# Allegro board PCB_ESP32-P4-EYE-MB_V2.3_20250411.brd
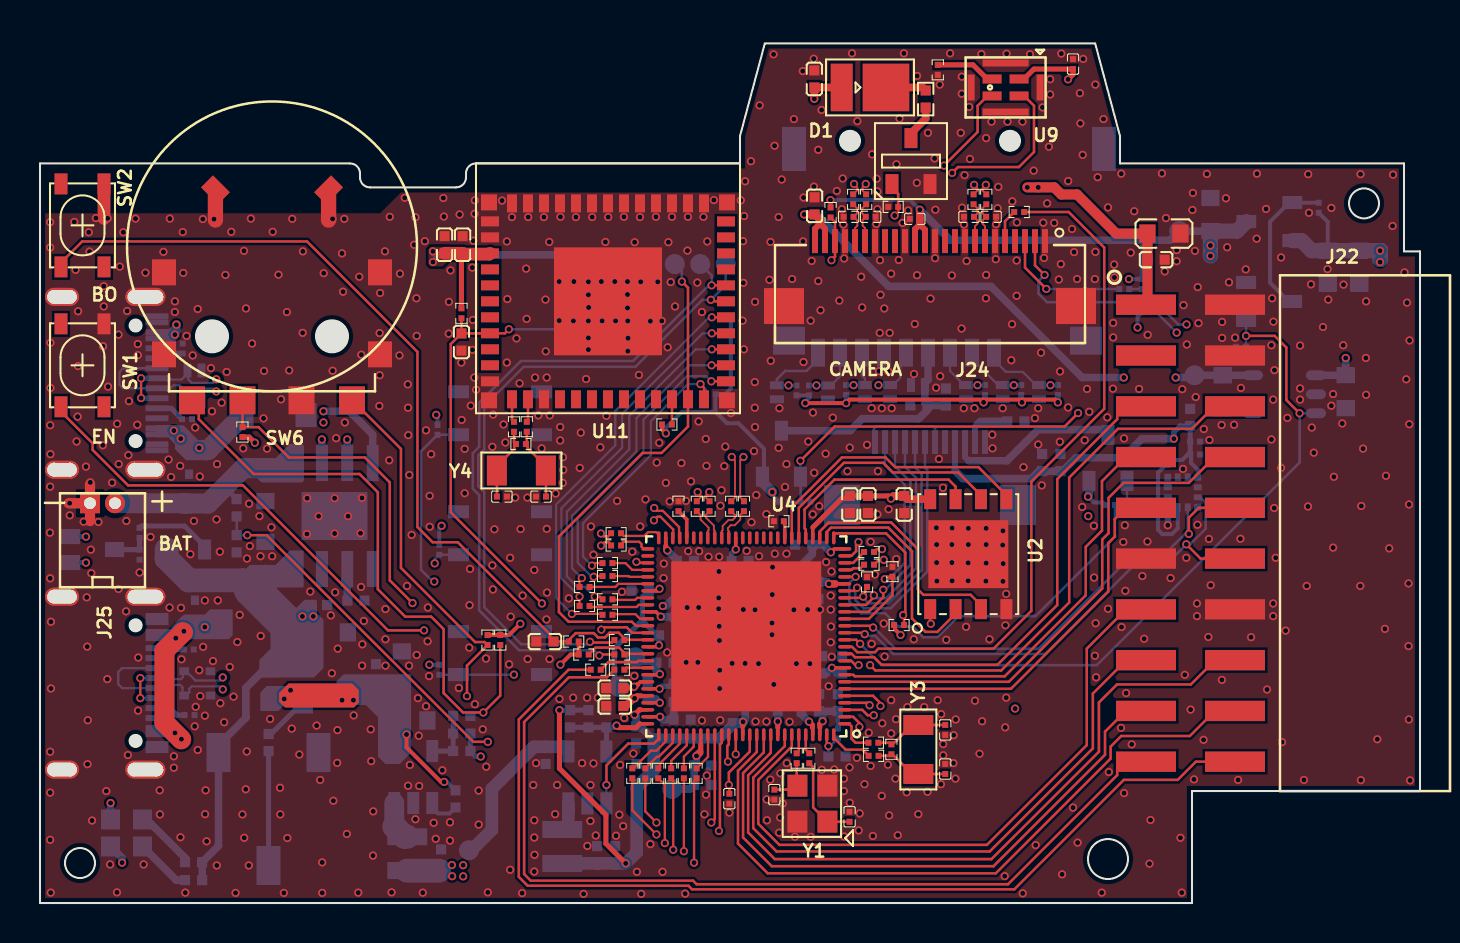
[diagram p0: board, top side]
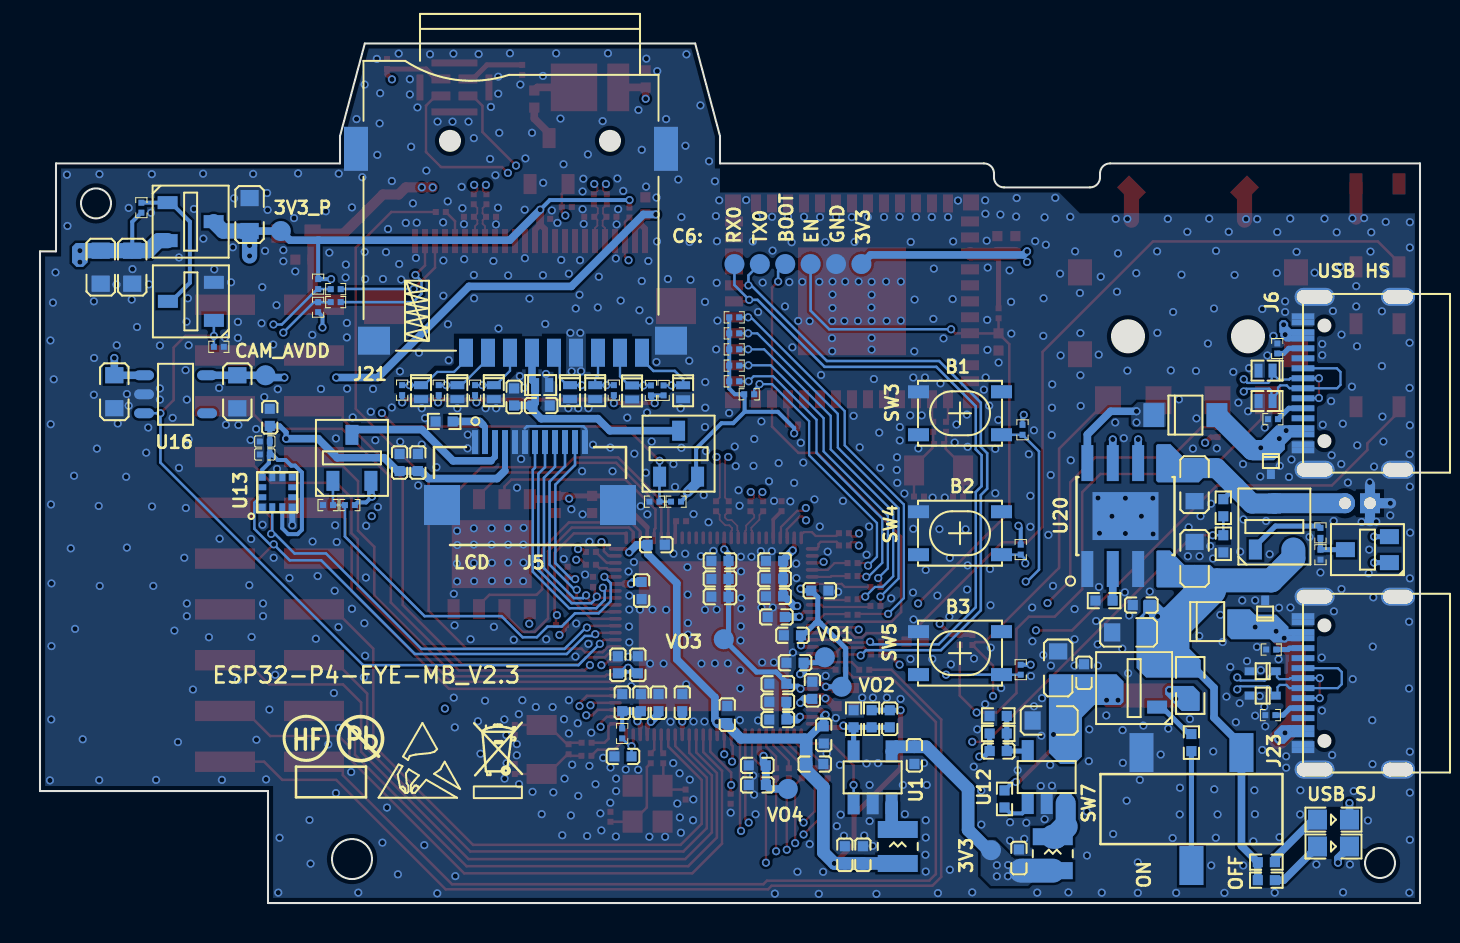
[diagram p1: board, bottom side, seen from below]

Outline 69 x 43 mm; copper layers: TOP, L2_GND1, L3_SIGNAL, L4_GND2, L5_POWER, BOTTOM. Coordinates in mm from the lower left corner of the outline.
Outline path: circle c2,2 r0.75 ; circle c2.5,20 r0.25 ; circle c3.75,20 r0.25 ; circle c4.78,28.89 r0.3 ; circle c4.78,23.11 r0.3 ; circle c4.78,13.89 r0.3 ; circle c4.78,8.11 r0.3 ; circle c8.6,28.35 r0.8 ; circle c14.6,28.35 r0.8 ; circle c40.5,38.13 r0.5 ; circle c48.5,38.13 r0.5 ; circle c53.4,2.2 r1 ; circle c66.2,35 r0.75 ; 0,37 0,0 57.6,0 57.6,5.6 69,5.6 69,32.6 68.2,32.6 68.2,37 54,37 54,38.37 52.76,43 36.24,43 35,38.37 35,37 21.8,37 arc(21.45,36.85) 21.3,36.5 21.3,36.3 arc(21.15,35.95) 20.8,35.8 16.5,35.8 arc(16.15,35.95) 16,36.3 16,36.5 arc(15.85,36.85) 15.5,37 0,37 ; 0.7,30.02 arc(0.4,30.32) 0.7,30.62 1.5,30.62 arc(1.8,30.32) 1.5,30.02 0.7,30.02 ; 0.7,21.38 arc(0.4,21.68) 0.7,21.98 1.5,21.98 arc(1.8,21.68) 1.5,21.38 0.7,21.38 ; 0.7,15.03 arc(0.4,15.32) 0.7,15.62 1.5,15.62 arc(1.8,15.32) 1.5,15.03 0.7,15.03 ; 0.7,6.38 arc(0.4,6.67) 0.7,6.97 1.5,6.97 arc(1.8,6.67) 1.5,6.38 0.7,6.38 ; 4.72,30.02 arc(4.42,30.32) 4.72,30.62 5.82,30.62 arc(6.12,30.32) 5.82,30.02 4.72,30.02 ; 4.72,21.38 arc(4.42,21.68) 4.72,21.98 5.82,21.98 arc(6.12,21.68) 5.82,21.38 4.72,21.38 ; 4.72,15.03 arc(4.42,15.32) 4.72,15.62 5.82,15.62 arc(6.12,15.32) 5.82,15.03 4.72,15.03 ; 4.72,6.38 arc(4.42,6.67) 4.72,6.97 5.82,6.97 arc(6.12,6.67) 5.82,6.38 4.72,6.38

## Design rules (mm)
net group CAM_C: nets CAM_CN CAM_CP
net group CAM_D: nets CAM_DN CAM_DP
net group CSI_CLKN: nets CSI_CLKN CSI_CLKN_A
net group CSI_CLKP: nets CSI_CLKP CSI_CLKP_A
net group CSI_DATA0N: nets CSI_DATA0N CSI_DATA0N_A
net group CSI_DATA0P: nets CSI_DATA0P CSI_DATA0P_A
net group GPIO24: nets GPIO24 USB_SJ_DN
net group GPIO25: nets GPIO25 USB_SJ_DP
net group GPIO27: nets GPIO27 SD2_CMD
net group GPIO28: nets GPIO28 SD2_CLK
net group GPIO29: nets GPIO29 SD2_D0
net group GPIO30: nets GPIO30 SD2_D1
net group GPIO31: nets GPIO31 SD2_D2
net group GPIO32: nets GPIO32 SD2_D3
net group GPIO39: nets GPIO39 SD1_D0
net group GPIO40: nets GPIO40 SD1_D1
net group GPIO41: nets GPIO41 SD1_D2
net group GPIO42: nets GPIO42 SD1_D3
net group GPIO43: nets GPIO43 SD1_CLK
net group GPIO44: nets GPIO44 SD1_CMD
net group USB2: nets USB_DM USB_DP

## Placement (name value [footprint] x y rotation side)
C1  22pF/50V(5%)  [C0201]  40.48 4.31 90 top
C2  1uF/10V(10%)  [C0402]  39.85 7.33 180 bottom
C3  0.1uF/10V(10%)(NC)  [C0402]  25.25 13.08 180 top
C4  22pF/50V(5%)  [C0201]  36.72 5.42 270 top
C5  0.1uF/10V(10%)  [C0402]  43.21 19.94 270 top
C6  4.7uF/6.3V(20%)  [C0402]  25.28 7.39 270 bottom
C7  22pF/50V(5%)(NC)  [C0402]  26.51 9.22 270 bottom
C8  10uF/6.3V(20%)  [C0402]  27.86 2.41 90 bottom
C18  22pF/50V(5%)  [C0201]  45.26 8.66 270 top
C19  22pF/50V(5%)  [C0201]  45.26 6.7 90 top
C20  1uF/10V(10%)  [C0402]  41.39 19.94 270 top
C25  0.1uF/10V(10%)  [C0402]  40.49 19.94 270 top
C47  10uF/6.3V(20%)  [C0402]  38.73 34.88 90 top
C48  0.1uF/10V(10%)  [C0201]  43.74 34.23 180 top
C50  1uF/10V(10%)  [C0402]  28.74 10.75 180 top
C51  1uF/10V(10%)  [C0402]  28.74 9.85 180 top
C52  0.1uF/10V(10%)  [C0402]  38.72 41.23 90 top
C53  10nF/10V(10%)  [C0201]  57.76 22.44 0 bottom
C55  1uF/10V(10%)  [C0402]  32.11 10.97 0 bottom
C56  1uF/10V(10%)  [C0402]  31.25 12.02 0 bottom
C82  10uF/6.3V(20%)  [C0402]  39.89 10.02 90 bottom
C83  0.1uF/10V(10%)  [C0402]  40.11 11.92 90 bottom
C84  0.1uF/10V(10%)  [C0402]  38.96 10.02 90 bottom
C85  0.1uF/10V(10%)  [C0402]  38.07 10.02 90 bottom
C86  0.1uF/10V(10%)  [C0402]  38.19 17.92 180 bottom
C87  10uF/6.3V(20%)  [C0402]  39.11 11.92 90 bottom
C88  0.1uF/10V(10%)  [C0402]  38.92 15.63 270 bottom
C89  10uF/6.3V(20%)  [C0402]  30.26 6.95 180 bottom
C90  0.1uF/10V(10%)  [C0402]  36.89 10.02 90 bottom
C91  1uF/10V(10%)  [C0402]  35 15.32 0 bottom
C92  0.1uF/10V(10%)  [C0402]  35 16.21 0 bottom
C93  10nF/50V(10%)  [C0402]  35 17.11 0 bottom
C94  0.1uF/10V(10%)  [C0402]  34.64 9.42 90 bottom
C95  10uF/6.3V(20%)  [C0402]  32.11 10.07 0 bottom
C96  0.1uF/10V(10%)  [C0402]  32.11 9.18 0 bottom
C97  0.1uF/10V(10%)  [C0402]  32.18 14.31 0 bottom
C98  4.7uF/6.3V(20%)  [C0402]  32.27 15.34 0 bottom
C99  0.1uF/10V(10%)  [C0402]  32.27 16.23 0 bottom
C100  10nF/50V(10%)  [C0402]  32.27 17.12 0 bottom
C101  0.1uF/10V(10%)  [C0402]  33.14 6.89 0 bottom
C102  10uF/6.3V(20%)  [C0402]  33.14 5.91 0 bottom
C103  0.1uF/10V(10%)  [C0402]  30.38 10.64 90 bottom
C104  1uF/10V(10%)  [C0402]  31.38 13.39 0 bottom
C105  0.1uF/10V(10%)  [C0402]  30.01 15.63 180 bottom
C107  0.1uF/10V(10%)  [C0402]  29.81 8.41 270 bottom
C109  10uF/6.3V(20%)  [C0402]  20.23 32.93 90 top
C110  0.1uF/10V(10%)  [C0402]  21.13 32.93 90 top
C111  0.1uF/10V(10%)  [C0402]  21.07 28.07 270 top
C113  10uF/10V(20%)  [C0603]  18.09 11.76 90 bottom
C114  0.1uF/10V(10%)  [C0402]  16.8 11.52 90 bottom
C118  10uF/10V(20%)  [C0603]  14.57 13.54 0 bottom
C119  0.1uF/10V(10%)  [C0402]  13.93 14.9 0 bottom
C120  10uF/10V(20%)  [C0603]  18.54 9.13 0 bottom
C121  22pF/50V(5%)(NC)  [C0402]  21.09 7.6 180 bottom
C122  10uF/6.3V(20%)  [C0402]  20.06 2.25 90 bottom
C138  10uF/10V(20%)  [C0603]  65.28 25.58 270 bottom
C141  10uF/10V(20%)  [C0603]  59.13 25.58 270 bottom
C148  10uF/6.3V(20%)  [C0402]  45.3 25.32 90 bottom
C149  0.1uF/10V(10%)  [C0402]  43.94 24.89 180 bottom
C150  10uF/6.3V(20%)(NC)  [C0402]  51.02 22.04 90 bottom
C151  0.1uF/10V(10%)  [C0402]  50.11 22.04 90 bottom
C152  0.1uF/10V(10%)  [C0201]  51.65 41.97 90 top
C160  0.1uF/10V(10%)  [C0402]  55.8 32.18 0 top
C161  10uF/10V(20%)  [C0603]  56.2 33.49 0 top
C163  TBD  [C0201]  47.55 34.33 0 top
C164  TBD  [C0201]  46.45 34.33 180 top
C165  TBD  [C0201]  41.54 34.33 0 top
C166  TBD  [C0201]  40.43 34.33 180 top
C168  22uF/10V(20%)  [C0603]  11.27 20.93 90 bottom
C169  10uF/10V(20%)  [C0603]  11.27 17.24 270 bottom
C170  22pF/50V(5%)  [C0201]  23.09 20.33 0 top
C171  22pF/50V(5%)  [C0201]  25.05 20.33 180 top
C172  0.1uF/10V(10%)(NC)  [C0201]  34.47 5.22 270 top
C173  10uF/6.3V(20%)  [C0402]  28.76 2.41 90 bottom
C174  10uF/10V(20%)  [C0603]  64.39 31.81 270 bottom
C175  10uF/10V(20%)(NC)  [C0603]  58.52 34.44 90 bottom
C176  0.1uF/10V(10%)  [C0201]  57.76 23.09 0 bottom
C177  2.2uF/10V(20%)  [C0402]  57.51 24.3 90 bottom
C178  10uF/10V(20%)  [C0603]  65.96 31.81 270 bottom
D1  WHITE LED  [LED2835]  41.5 40.8 0 top
D3  LESD8D3.3CAT5G  [SOD882]  43.89 25.91 0 bottom
D4  LESD8D3.3CAT5G  [SOD882]  46.31 25.56 90 bottom
D5  GREEN LED  [LED0603]  4.33 4.17 0 bottom
D6  LESD8D3.3CAT5G  [SOD882]  42.5 25.56 90 bottom
D7  LESD8D3.3CAT5G  [SOD882]  48.13 25.56 90 bottom
D8  LESD8D3.3CAT5G  [SOD882]  49.95 25.56 90 bottom
D10  LESD8D3.3CAT5G  [SOD882]  39.4 25.54 90 bottom
D11  LESD8D3.3CAT5G  [SOD882]  41.24 25.56 90 bottom
D12  DSS24  [SOD123FL]  11.73 24.41 180 bottom
D15  LESD5D5.0CT1G  [SOD523]  7.45 22.11 90 bottom
D16  LESD5D5.0CT1G  [SOD523]  7.87 11.6 180 bottom
D17  LESD5D5.0CT1G  [SOD523]  7.87 10.38 180 bottom
D18  DSS24  [SOD123FL]  10.64 14.08 180 bottom
D19  LESD5D5.0CT1G  [SOD523]  7.74 14.48 270 bottom
D20  ESD7951ST5G  [SOD882]  7.72 26.64 180 bottom
D21  ESD7951ST5G  [SOD882]  7.72 25.11 180 bottom
D22  LESD8D3.3CAT5G  [SOD882]  36.84 25.55 90 bottom
D23  BAT54CW  [SOT323]  2.63 17.68 0 bottom
D25  RED LED  [LED0603]  4.33 2.83 0 bottom
J5  FFC12-0P5-LCD  [FFC12_0P5_AFC24-S12FIC-00]  44.5 23.06 180 bottom
J6  -  [USB_TYPEC_16P_F]  4.78 26 90 bottom
J21  TF_CARD  [TF_CARDA]  45.45 38.13 90 bottom
J22  CON10X2  [CON10X2_2P54_SMT_R]  56.77 18.5 270 top
J23  -  [USB_TYPEC_16P_F]  4.78 11 90 bottom
J24  FPC_24P  [FFC24_0P5_FPC-05FB-24PH20]  44.5 33.11 0 top
J25  CON2X1_1P25  [GH2_1P25_R]  3.12 20 0 top
L1  2.2uH(20%)_2A  [L2520]  26.11 2.83 270 bottom
L5  2.2uH(20%)_2A  [L2520]  18.36 2.47 270 bottom
Q1  LBSS138LT1G  [SOT23-3]  61.46 30.1 0 bottom
Q2  AO3401A  [SOT23-3]  53.4 22.27 90 bottom
Q4  SI2302  [SOT23-3]  43.55 37.12 90 top
Q6  AO3401A  [SOT23-3]  7.28 18.83 90 bottom
Q8  AO3401A  [SOT23-3]  37.07 22.48 90 bottom
Q9  AO3401A  [SOT23-3]  14.29 10.75 0 bottom
Q10  AO3401A  [SOT23-3]  61.47 34.09 180 bottom
R1  0(1%)  [R0201]  38.46 7.24 270 top
R2  10K(1%)  [R0201]  39.89 8.48 90 bottom
R3  10K(1%)  [R0201]  27.19 12.43 0 top
R4  10K(1%)  [R0201]  26.69 13.08 0 top
R5  0(1%)  [R0201]  37.83 7.24 270 top
R7  10K(1%)  [R0201]  42.95 13.91 180 top
R8  499K(1%)(NC)  [R0402]  27.42 9.22 270 bottom
R9  499K(1%)(NC)  [R0402]  28.32 9.22 90 bottom
R10  2K(1%)  [R0402]  15.8 15.13 0 bottom
R15  1M(1%)  [R0402]  9.83 19.77 90 bottom
R16  332K(1%)  [R0402]  9.83 17.97 270 bottom
R17  51K(1%)  [R0201]  47.25 25.66 90 bottom
R23  0(1%)  [R0201]  41.45 17.56 0 top
R24  0(1%)  [R0201]  47.31 35.2 90 top
R25  0(1%)  [R0201]  46.68 35.2 90 top
R26  0(1%)  [R0201]  40.66 35.2 90 top
R27  0(1%)  [R0201]  41.31 35.2 90 top
R58  10M(1%)(NC)  [R0201]  42.57 7.69 90 top
R59  0(1%)  [R0201]  41.67 8.02 0 top
R61  0(1%)  [R0201]  41.68 7.36 0 top
R67  10K(1%)  [R0201]  39.53 34.54 270 top
R72  3.9(1%)  [R0402]  44.28 40.22 270 top
R73  10K(1%)  [R0201]  42.66 34.83 180 top
R79  10K(1%)(NC)  [R0201]  54.6 19.91 0 bottom
R102  0(1%)  [R0201]  32.83 6.49 270 top
R103  0(1%)  [R0201]  32.19 6.49 270 top
R104  33(1%)  [R0201]  28.8 18.5 180 top
R105  33(1%)  [R0201]  28.8 17.89 180 top
R107  0(1%)  [R0201]  31.56 6.49 270 top
R108  0(1%)  [R0201]  30.91 6.49 270 top
R110  0(1%)  [R0201]  30.26 6.49 270 top
R118  0(1%)  [R0201]  28.97 11.67 180 top
R122  0(1%)  [R0201]  29.62 6.49 270 top
R128  51K(1%)  [R0201]  34.29 29.3 180 bottom
R129  51K(1%)  [R0201]  34.29 28.5 180 bottom
R130  51K(1%)  [R0201]  34.29 27.7 180 bottom
R131  51K(1%)  [R0201]  34.29 26.89 180 bottom
R132  51K(1%)  [R0201]  34.29 26.1 180 bottom
R133  51K(1%)  [R0201]  33.54 25.45 180 bottom
R134  100K(1%)  [R0201]  21.07 29.5 90 top
R135  10K(1%)  [R0201]  31.35 23.94 180 top
R142  5.1K(1%)  [R0201]  7.35 24.21 180 bottom
R143  5.1K(1%)  [R0201]  7.14 27.74 270 bottom
R145  10K(1%)  [R0402]  20.77 5.21 270 bottom
R146  100K(1%)  [R0402]  21.09 8.48 180 bottom
R148  22.1K(1%)  [R0402]  21.09 9.36 0 bottom
R202  4.02K(1%)  [R0201]  36.94 19.1 180 top
R203  4.02K(1%)  [R0201]  31.92 19.85 90 top
R230  10K(1%)  [R0201]  63.93 34.79 270 bottom
R231  51K(1%)  [R0201]  49.06 25.66 90 bottom
R232  51K(1%)  [R0201]  40.31 25.66 90 bottom
R233  51K(1%)  [R0201]  38.45 25.65 90 bottom
R234  51K(1%)  [R0201]  50.89 25.66 90 bottom
R238  10K(1%)(NC)  [R0201]  42.62 16.57 90 top
R241  10K(1%)(NC)  [R0201]  41.35 16.07 90 top
R243  10(1%)  [R0402]  48.79 24.09 0 bottom
R246  10K(1%)  [R0201]  44.89 41.68 90 top
R250  0(1%)  [R0201]  28.97 12.43 180 top
R255  0(1%)  [R0201]  41.45 16.93 0 top
R259  0(1%)  [R0201]  27.79 11.67 180 top
R262  10K(1%)  [R0201]  19.88 23.67 90 bottom
R263  10K(1%)  [R0201]  19.96 17.68 90 bottom
R264  10K(1%)  [R0201]  19.96 11.67 90 bottom
R268  5.1K(1%)  [R0201]  7.48 9.4 180 bottom
R269  5.1K(1%)  [R0201]  7.44 12.68 180 bottom
R272  2.2K(1%)  [R0201]  55.09 29.81 270 bottom
R273  2.2K(1%)  [R0201]  55.09 30.96 90 bottom
R274  0(1%)  [R0201]  27.23 14.86 180 top
R275  0(1%)  [R0201]  28.37 15.19 180 top
R276  0(1%)  [R0201]  27.23 15.81 180 top
R277  0(1%)  [R0201]  28.37 16.36 180 top
R278  0(1%)  [R0201]  28.37 17.01 180 top
R279  0(1%)  [R0201]  28.37 14.42 180 top
R280  51K(1%)  [R0201]  37.82 25.65 90 bottom
R283  0(1%)  [R0201]  32.84 19.85 90 top
R284  0(1%)  [R0201]  33.48 19.85 90 top
R285  0(1%)  [R0201]  34.56 19.85 90 top
R286  0(1%)  [R0201]  35.2 19.85 90 top
R288  100K(1%)  [R0201]  4.98 17.42 270 bottom
R289  100K(1%)  [R0201]  4.98 18.52 90 bottom
R290  5.1K(1%)  [R0402]  7.68 1.14 0 bottom
R291  5.1K(1%)  [R0402]  7.68 2.04 0 bottom
R292  10K(1%)  [R0201]  23.01 13.16 90 top
R293  10K(1%)  [R0201]  22.38 13.16 90 top
R295  10K(1%)  [R0201]  10.12 23.56 270 top
R297  10M(1%)(NC)  [R0201]  24.05 22.96 0 top
R298  0(1%)  [R0201]  23.7 23.82 270 top
R299  0(1%)  [R0201]  24.34 23.83 270 top
R300  0(1%)  [R0201]  28.97 13.16 180 top
R302  0(1%)  [R0201]  54.22 30.06 0 bottom
R303  0(1%)  [R0201]  54.22 30.71 0 bottom
R304  0(1%)  [R0201]  48.96 34.57 180 top
R306  10K(1%)  [R0201]  53.51 19.91 0 bottom
R307  100K(1%)  [R0402]  11.43 8.03 270 bottom
R308  10K(1%)(NC)  [R0201]  38.28 20.08 180 bottom
R309  10K(1%)  [R0201]  37.2 20.08 180 bottom
R310  10K(1%)(NC)  [R0201]  60.06 27.83 0 bottom
R311  0(1%)(NC)  [R0603]  11.49 10.88 90 bottom
SW1  SW_SP_4P  [SW4-4P2X3P2X2P5-SMT]  2.12 26.9 270 top
SW2  SW_SP_4P  [SW4-4P2X3P2X2P5-SMT]  2.12 33.9 270 top
SW3  SW_SP_4P  [SW4-4P2X3P2X2P5-SMT]  23 24.5 180 bottom
SW4  SW_SP_4P  [SW4-4P2X3P2X2P5-SMT]  23 18.5 180 bottom
SW5  SW_SP_4P  [SW4-4P2X3P2X2P5-SMT]  23 12.5 180 bottom
SW6  -  [SIQ-02FVS3]  11.6 32.85 0 top
SW7  K3-1235S-F1  [SW3-9P1X3P5X5P5-SMT]  11.43 4.7 180 bottom
TP24  TESTPOINT  [TPC1]  28.92 10.82 180 bottom
TP25  TESTPOINT  [TPC1]  31.61 5.71 180 bottom
TP26  TESTPOINT  [TPC1]  29.76 12.29 180 bottom
TP27  TESTPOINT  [TPC1]  34.81 13.2 180 bottom
TP44  TESTPOINT  [TPC1]  30.47 31.97 0 bottom
TP45  TESTPOINT  [TPC1]  31.74 31.97 0 bottom
TP46  TESTPOINT  [TPC1]  34.28 31.97 90 bottom
TP47  TESTPOINT  [TPC1]  33.01 31.97 90 bottom
TP48  TESTPOINT  [TPC1]  29.2 31.97 90 bottom
TP49  TESTPOINT  [TPC1]  21.45 2.64 0 bottom
TP51  TESTPOINT  [TPC1]  57.72 26.4 0 bottom
TP52  TESTPOINT  [TPC1]  56.96 33.62 270 bottom
TP53  TESTPOINT  [TPC1]  27.93 31.97 180 bottom
U1  TLV62569  [SOT23_0P95_2P6]  27.37 6.28 90 bottom
U2  FLASH  [WSON8_1P27_6X5_E4X3P4]  46.41 17.45 90 top
U4  ESP32-P4  [QFN104_0P35_10_E7P5_A]  35.31 13.34 180 top
U9  MSM261D  [OCLGA-8]  48.28 40.8 90 top
U11  -  [ESP32-C6-MINI-1U]  21.8 24.5 0 top
U12  TLV62569  [SOT23_0P95_2P6]  18.67 6.3 90 bottom
U13  QMA6100P  [LGA12_0P5_2]  57.14 20.55 90 bottom
U16  ME6211C33M5G-N  [SOT23-5]  62.22 25.45 180 bottom
U20  AP5056  [SOP8_1P27_4P9X3P9_E3P3X2P4]  14.73 19.36 90 bottom
Y1  40MHz  [XTAL3225]  38.62 4.97 90 top
Y3  32.768KHz  [XTAL3215_2P]  43.92 7.68 270 top
Y4  32.768KHz  [XTAL3215_2P]  24.07 21.64 180 top

## Library data of the parts
C1-C5 C7 C18 C19 C25 C47 C48 C50-C53 C55 C56 C83-C86 C88 C90 C92 C94 C96 C97 C99 C101 C103 C105 C107 C109-C111 C113 C114 C118 C119 C121 C138 C141 C148-C151 C160 C161 C163-C166 C170-C172 C174-C178 = CAPACITOR
C6 C8 C20 C82 C87 C89 C91 C93 C95 C98 C100 C102 C104 C120 C122 C173 = CAP
C152 C168 C169 = CAP NP
D1 = DIODE_LIGHT
D3 D4 D6-D8 D10 D11 D15-D17 D19-D22 = DIODE_BI_DIR
D5 D25 = LED_1
D12 D18 = DIODE_S
D23 = BAT54C_0
J5 = FFC12-0P5-LCD_3
J6 J23 = USB_TYPEC_16P_F
J21 = TF_SD_SOCKET
J22 = CON10X2
J24 = FPC_24P
J25 = CON2X1
L1 L5 = INDUCTOR
Q1 = MOSFET_EN_DGS_0
Q2 Q8 Q10 = PMOS
Q4 = NMOS
Q6 Q9 = PMOS_0
R1-R5 R7-R9 R17 R23-R27 R58 R59 R61 R67 R72 R73 R79 R118 R128-R135 R142 R143 R145 R146 R148 R202 R203 R230-R234 R238 R241 R243 R250 R255 R259 R262-R264 R268 R269 R272 R273 R280 R292 R293 R295 R297-R300 R302-R304 R306 R308-R311 = RESISTOR
R10 R15 R16 R246 R288-R291 R307 = RESISTOR_0
R102 R103 R107 R108 R110 R122 R274-R279 R283-R286 = RESISTOR: signal model: RESISTOR_R0201_0(1%)_0(1%)
R104 R105 = RESISTOR: signal model: RESISTOR_R0201_33(1%)_33(1%)
SW1-SW5 = SW_SP_4P
SW6 = Encoder
SW7 = SS-12D10L3
TP24-TP27 TP44-TP49 TP51-TP53 = TESTPOINT
U1 U12 = TLV62565
U2 = FLASH_EPAD
U4 = ESP32-P4_QFN104_ECO1_0
U9 = NSM0418DT
U11 = ESP32-C6-MINI-1
U13 = QMA7981_0
U16 = LDO_SOT23-5_3
U20 = AP5056
Y1 = XTAL
Y3 Y4 = XTAL_2P

## Footprints (pads in the part's own frame, mm; a bottom-side part is the same pattern mirrored in y, then rotated)
C0201
  rect 0.3x0.3 smd: 1(-0.25,0) 2(0.25,0)
C0402
  rect 0.508x0.508 smd: 1(-0.429,0) 2(0.429,0)
C0603
  rect 0.813x0.914 smd: 1(-0.826,0) 2(0.826,0)
CON10X2_2P54_SMT_R
  rect 1.02x3 smd: 1(-11.43,-1.475) 2(-11.43,2.975) 3(-8.89,-1.475) 4(-8.89,2.975) 5(-6.35,-1.475) 6(-6.35,2.975) 7(-3.81,-1.475) 8(-3.81,2.975) 9(-1.27,-1.475) 10(-1.27,2.975) 11(1.27,-1.475) 12(1.27,2.975) 13(3.81,-1.475) 14(3.81,2.975) 15(6.35,-1.475) 16(6.35,2.975) 17(8.89,-1.475) 18(8.89,2.975) 19(11.43,-1.475) 20(11.43,2.975)
ESP32-C6-MINI-1U
  rect 0.9x0.5 smd: 1(0.7,9.6) 2(0.7,8.8) 3(0.7,8) 4(0.7,7.2) 5(0.7,6.4) 6(0.7,5.6) 7(0.7,4.8) 8(0.7,4) 9(0.7,3.2) 10(0.7,2.4) 11(0.7,1.6) 25(12.5,1.6) 26(12.5,2.4) 27(12.5,3.2) 28(12.5,4) 29(12.5,4.8) 30(12.5,5.6) 31(12.5,6.4) 32(12.5,7.2) 33(12.5,8) 34(12.5,8.8) 35(12.5,9.6)
  rect 0.5x0.9 smd: 12(1.8,0.7) 13(2.6,0.7) 14(3.4,0.7) 15(4.2,0.7) 16(5,0.7) 17(5.8,0.7) 18(6.6,0.7) 19(7.4,0.7) 20(8.2,0.7) 21(9,0.7) 22(9.8,0.7) 23(10.6,0.7) 24(11.4,0.7) 36(11.4,10.5) 37(10.6,10.5) 38(9.8,10.5) 39(9,10.5) 40(8.2,10.5) 41(7.4,10.5) 42(6.6,10.5) 43(5.8,10.5) 44(5,10.5) 45(4.2,10.5) 46(3.4,10.5) 47(2.6,10.5) 48(1.8,10.5)
  rect 5.4x5.4 smd: 49(6.6,5.6)
  rect 0.8x0.8 smd: 50(12.55,10.55) 51(12.55,0.65) 52(0.65,0.65) 53(0.65,10.55)
FFC12_0P5_AFC24-S12FIC-00
  rect 0.3x1.2 smd: 1(-2.75,0) 2(-2.25,0) 3(-1.75,0) 4(-1.25,0) 5(-0.75,0) 6(-0.25,0) 7(0.25,0) 8(0.75,0) 9(1.25,0) 10(1.75,0) 11(2.25,0) 12(2.75,0)
  rect 1.8x2 smd: 13(-4.4,-3.15) 14(4.4,-3.15)
FFC24_0P5_FPC-05FB-24PH20
  rect 0.3x1.2 smd: 1(5.75,0) 2(5.25,0) 3(4.75,0) 4(4.25,0) 5(3.75,0) 6(3.25,0) 7(2.75,0) 8(2.25,0) 9(1.75,0) 10(1.25,0) 11(0.75,0) 12(0.25,0) 13(-0.25,0) 14(-0.75,0) 15(-1.25,0) 16(-1.75,0) 17(-2.25,0) 18(-2.75,0) 19(-3.25,0) 20(-3.75,0) 21(-4.25,0) 22(-4.75,0) 23(-5.25,0) 24(-5.75,0)
  rect 2x1.8 smd: 25(-7.3,-3.25) 26(7.3,-3.25)
GH2_1P25_R
  rect 1x1 hole 0.5: 1(-0.625,0)
  round 1 hole 0.5: 2(0.625,0)
L2520
  rect 0.85x2 smd: 1(-0.85,0) 2(0.85,0)
LED0603
  rect 0.95x1 smd: 1(0.8,0) 2(-0.8,0)
LED2835
  rect 1.1x2.38 smd: 1(-1.415,0)
  rect 2.33x2.38 smd: 2(0.8,0)
LGA12_0P5_2
  rect 0.35x0.35 smd: 1(-0.75,0.75) 4(-0.75,-0.75) 7(0.75,-0.75) 10(0.75,0.75)
  rect 0.4x0.3 smd: 2(-0.75,0.25) 3(-0.75,-0.25) 8(0.75,-0.25) 9(0.75,0.25)
  rect 0.3x0.4 smd: 5(-0.25,-0.75) 6(0.25,-0.75) 11(0.25,0.75) 12(-0.25,0.75)
OCLGA-8
  rect 0.45x0.95 smd: 1(0.425,-0.675) 2(0.425,0.675) 3(-0.425,0.675) 4(-0.425,-0.675)
  rect 1.3x0.35 smd: 5(0,-1.725) 7(0,1.725)
  rect 0.35x2.3 smd: 6(-1.225,0) 8(1.225,0)
QFN104_0P35_10_E7P5_A
  oval 0.65x0.18 smd: 1(-4.925,4.375) 2(-4.925,4.025) 3(-4.925,3.675) 4(-4.925,3.325) 5(-4.925,2.975) 6(-4.925,2.625) 7(-4.925,2.275) 8(-4.925,1.925) 9(-4.925,1.575) 10(-4.925,1.225) 11(-4.925,0.875) 12(-4.925,0.525) 13(-4.925,0.175) 14(-4.925,-0.175) 15(-4.925,-0.525) 16(-4.925,-0.875) 17(-4.925,-1.225) 18(-4.925,-1.575) 19(-4.925,-1.925) 20(-4.925,-2.275) 21(-4.925,-2.625) 22(-4.925,-2.975) 23(-4.925,-3.325) 24(-4.925,-3.675) 25(-4.925,-4.025) 26(-4.925,-4.375) 53(4.925,-4.375) 54(4.925,-4.025) 55(4.925,-3.675) 56(4.925,-3.325) 57(4.925,-2.975) 58(4.925,-2.625) 59(4.925,-2.275) 60(4.925,-1.925) 61(4.925,-1.575) 62(4.925,-1.225) 63(4.925,-0.875) 64(4.925,-0.525) 65(4.925,-0.175) 66(4.925,0.175) 67(4.925,0.525) 68(4.925,0.875) 69(4.925,1.225) 70(4.925,1.575) 71(4.925,1.925) 72(4.925,2.275) 73(4.925,2.625) 74(4.925,2.975) 75(4.925,3.325) 76(4.925,3.675) 77(4.925,4.025) 78(4.925,4.375)
  oval 0.18x0.65 smd: 27(-4.375,-4.925) 28(-4.025,-4.925) 29(-3.675,-4.925) 30(-3.325,-4.925) 31(-2.975,-4.925) 32(-2.625,-4.925) 33(-2.275,-4.925) 34(-1.925,-4.925) 35(-1.575,-4.925) 36(-1.225,-4.925) 37(-0.875,-4.925) 38(-0.525,-4.925) 39(-0.175,-4.925) 40(0.175,-4.925) 41(0.525,-4.925) 42(0.875,-4.925) 43(1.225,-4.925) 44(1.575,-4.925) 45(1.925,-4.925) 46(2.275,-4.925) 47(2.625,-4.925) 48(2.975,-4.925) 49(3.325,-4.925) 50(3.675,-4.925) 51(4.025,-4.925) 52(4.375,-4.925) 79(4.375,4.925) 80(4.025,4.925) 81(3.675,4.925) 82(3.325,4.925) 83(2.975,4.925) 84(2.625,4.925) 85(2.275,4.925) 86(1.925,4.925) 87(1.575,4.925) 88(1.225,4.925) 89(0.875,4.925) 90(0.525,4.925) 91(0.175,4.925) 92(-0.175,4.925) 93(-0.525,4.925) 94(-0.875,4.925) 95(-1.225,4.925) 96(-1.575,4.925) 97(-1.925,4.925) 98(-2.275,4.925) 99(-2.625,4.925) 100(-2.975,4.925) 101(-3.325,4.925) 102(-3.675,4.925) 103(-4.025,4.925) 104(-4.375,4.925)
  rect 7.5x7.5 smd: 105(0,0)
R0201
  rect 0.3x0.3 smd: 1(-0.25,0) 2(0.25,0)
R0402
  rect 0.508x0.508 smd: 1(-0.429,0) 2(0.429,0)
R0603
  rect 0.813x0.914 smd: 1(-0.826,0) 2(0.826,0)
SIQ-02FVS3
  round 1.6 hole 1.6 unplated: (-3,-4.5) (3,-4.5)
  rect 1.3x1.4 smd: 1(-4,-7.7) 2(-1.475,-7.7) 3(1.475,-7.7) 4(4,-7.7)
  rect 1.2x1.3 smd: 5(5.4,-5.4) 6(-5.4,-5.4) 7(-5.4,-1.3) 8(5.4,-1.3)
  rect 0.85x1.2 smd rot 45: 9(-2.828,2.828)
  rect 0.85x1.2 smd rot 135: 10(2.828,2.828)
SOD123FL
  rect 1.05x1.2 smd: 1(1.575,0) 2(-1.575,0)
SOD523
  rect 0.48x0.4 smd: 1(-0.66,0) 2(0.66,0)
SOD882
  rect 0.4x0.7 smd: 1(-0.35,0) 2(0.35,0)
SOP8_1P27_4P9X3P9_E3P3X2P4
  rect 1.8x0.6 smd: 1(-2.65,1.905) 2(-2.65,0.635) 3(-2.65,-0.635) 4(-2.65,-1.905) 5(2.65,-1.905) 6(2.65,-0.635) 7(2.65,0.635) 8(2.65,1.905)
  rect 2.4x3.3 smd: 9(0,0)
SOT23-3
  rect 1x0.65 smd: 1(-1.15,0.95) 2(-1.15,-0.95) 3(1.15,0)
SOT23-5
  oval 1x0.5 smd: 1(-1.575,0.95) 2(-1.575,0) 3(-1.575,-0.95) 4(1.575,-0.95) 5(1.575,0.95)
SOT23_0P95_2P6
  rect 1.1x0.6 smd: 1(-1.3,0.95) 2(-1.3,0) 3(-1.3,-0.95) 4(1.3,-0.95) 5(1.3,0.95)
SOT323
  rect 0.95x0.75 smd: 1(-1.1,0.65) 2(-1.1,-0.65) 3(1.1,0)
SW3-9P1X3P5X5P5-SMT
  rect 1.2x1.95 smd: 1(-2.5,2.825) 2(0,-2.825) 3(2.5,2.825)
SW4-4P2X3P2X2P5-SMT
  rect 1.05x0.65 smd: 1(-2.075,1.075) 2(-2.075,-1.075) 3(2.075,-1.075) 4(2.075,1.075)
TF_CARDA
  round 1 hole 1 unplated: (0,-4.95) (0,3.05)
  rect 1.4x0.7 smd: 1(-10.6,2.25) 2(-10.6,1.15) 3(-10.6,0.05) 4(-10.6,-1.05) 5(-10.6,-2.15) 6(-10.6,-3.25) 7(-10.6,-4.35) 8(-10.6,-5.45) 9(-10.6,-6.55)
  rect 1.4x1.6 smd: 10(-10,-8) 12(-10,6.85)
  rect 2.2x1.2 smd: 11(-0.4,-7.75) 13(-0.4,7.75)
TPC1
  round 1 smd: 1(0,0)
USB_TYPEC_16P_F
  round 0.6 hole 0.6 unplated: (-2.89,0) (2.89,0)
  rect 0.3x1.14 smd: 1(-3.35,1.07) 2(-3.05,1.07) 3(-2.55,1.07) 4(-2.25,1.07) 5(-1.75,1.07) 6(-1.25,1.07) 7(-0.75,1.07) 8(-0.25,1.07) 9(0.25,1.07) 10(0.75,1.07) 11(1.25,1.07) 12(1.75,1.07) 13(2.25,1.07) 14(2.55,1.07) 15(3.05,1.07) 16(3.35,1.07)
  oval 0.9x1.7 hole 0.6x1.4: 17(-4.325,-3.68) 20(4.325,-3.68)
  oval 0.9x2 hole 0.6x1.7: 18(-4.325,0.49) 19(4.325,0.49)
WSON8_1P27_6X5_E4X3P4
  rect 1x0.6 smd: 1(-2.75,1.905) 2(-2.75,0.635) 3(-2.75,-0.635) 4(-2.75,-1.905) 5(2.75,-1.905) 6(2.75,-0.635) 7(2.75,0.635) 8(2.75,1.905)
  rect 3.4x4 smd: 9(0,0)
XTAL3215_2P
  rect 1x1.5 smd: 1(-1.225,0) 2(1.225,0)
XTAL3225
  rect 1.1x1 smd: 1(-0.9,-0.75) 2(0.9,-0.75) 3(0.9,0.75) 4(-0.9,0.75)

## Nets
3V3_PERI: C48.1 C52.1 C53.1 C150.1 C151.1 C152.1 C175.1 C176.1 C177.1 D1.1(ANODE) J5.4(VDD) J24.13 J24.14 Q10.3(D) R67.1 R272.2 R273.2 TP52.1 U9.1(VDD) U13.3(VDD_IO) U13.10(SEN_B)
GND: C1.2 C2.1 C3.2 C4.2 C5.2 C6.2 C8.2 C18.2 C19.2 C20.2 C25.2 C47.2 C48.2 C50.2 C51.2 C52.2 C53.2 C55.2 C56.2 C82.2 C83.2 C84.2 C85.2 C86.2 C87.2 C88.2 C89.2 C90.2 C91.2 C92.2 C93.2 C94.2 C95.2 C96.2 C97.2 C98.2 C99.2 C100.2 C101.2 C102.2 C103.2 C104.2 C105.2 C107.2 C109.2 C110.2 C111.2 C113.2 C114.2 C118.2 C119.2 C120.2 C122.2 C138.2 C141.2 C148.2 C149.2 C150.2 C151.2 C152.2 C160.2 C161.2 C163.2 C164.2 C165.2 C166.2 C168.1 C169.1 C170.2 C171.2 C172.2 C173.2 C174.2 C175.2 C176.2 C177.2 C178.2 D3.1 D4.1 D6.1 D7.1 D8.1 D10.1 D11.1 D15.1 D16.1 D17.1 D19.1 D20.1 D21.1 D22.1 J5.1(GND1) J5.5(GND2) J5.6(GND3) J5.12(GND4) J5.13(GND5) J5.14(GND6) J6.1(A1_G) J6.2(B12_G) J6.15(B1_G) J6.16(A12_G) J6.17(E_G1) J6.18(E_G2) J6.19(E_G3) J6.20(E_G4) J21.6(VSS) J21.10(G1) J21.11(G2) J21.12(G3) J21.13(G4) J22.2 J22.4 J22.11 J22.14 J23.1(A1_G) J23.2(B12_G) J23.15(B1_G) J23.16(A12_G) J23.17(E_G1) J23.18(E_G2) J23.19(E_G3) J23.20(E_G4) J24.1 J24.6 J24.9 J24.12 J24.15 J24.18 J24.21 J24.25 J24.26 J25.1 Q1.2(S) Q4.2(S) R9.2 R10.2 R16.2 R73.2 R79.2 R142.1 R143.1 R148.2 R202.2 R203.2 R238.2 R241.2 R243.2 R246.1 R268.1 R269.1 R288.2 R308.1 R310.1 SW1.1 SW2.1 SW3.1 SW4.1 SW5.1 SW6.3(C) SW6.5(GND1) SW6.6(GND2) SW6.7(GND3) SW6.8(GND4) SW6.9(GND5) SW6.10(GND6) SW7.1 TP48.1 U1.2(GND) U2.4(GND) U2.9(EPAD) U4.105(GND) U9.5(GND1) U9.6(GND2) U9.7(GND3) U9.8(GND4) U11.1(GND#1) U11.2(GND#2) U11.11(GND#11) U11.14(GND#14) U11.36(GND#36) U11.37(GND#37) U11.38(GND#38) U11.39(GND#39) U11.40(GND#40) U11.41(GND#41) U11.42(GND#42) U11.43(GND#43) U11.44(GND#44) U11.45(GND#45) U11.46(GND#46) U11.47(GND#47) U11.48(GND#48) U11.49(EPAD) U11.50(GND#50) U11.51(GND#51) U11.52(GND#52) U11.53(GND#53) U12.2(GND) U13.1(AD0) U13.4(RES_V1) U13.8(GND_IO) U13.9(GND) U16.2(GND) U20.1(TEMP) U20.3(GND) U20.9(PGND) Y1.2(GND#2) Y1.4(GND#4)
VBAT: C168.2 J25.2 Q6.3(D) R15.2 U20.5(BAT)
VCC_5V: C113.1 C114.1 C120.1 C138.1 C160.1 C161.1 J22.1 Q9.3(D) R145.1 R311.1 U12.4(VIN) U16.1(VIN)
BAT_ADC: C172.1 R15.1 R16.1 U4.92(GPIO49)
BAT_CHRG: D25.2(CATHODE) U20.7(\\C\H\R\G)
BAT_STBY: D5.2(CATHODE) U20.6(\\S\T\D\B\Y)
BUTTON_1: R262.1 SW3.3 U4.3(GPIO3)
BUTTON_2: R263.1 SW4.3 U4.4(GPIO4)
BUTTON_3: R264.1 SW5.3 U4.5(GPIO5)
C6_BOOT: TP45.1 U4.64(GPIO33) U11.23(IO9)
C6_EN: C111.1 R134.1 TP44.1 U4.10(GPIO9) U11.8(EN)
C6_IO0: R298.1 U11.12(IO0)
C6_IO1: R299.1 U11.13(IO1)
C6_IO8: R135.1 U11.22(IO8)
C6_U0RXD: R300.2 TP46.1 U11.30(RXD0)
C6_U0TXD: R250.2 TP47.1 U11.31(TXD0)
CAM_3V3: C47.1 C141.1 J24.23 J24.24 TP51.1 U16.5(OUT)
CAM_CN: C164.1 J24.8 R25.1
CAM_CP: C163.1 J24.7 R24.1
CAM_DN: C165.1 J24.19 R27.1
CAM_DP: C166.1 J24.20 R26.1
CAM_I2C_SCL: J24.3 R303.1
CAM_I2C_SDA: J24.2 R302.1
CAM_MCLK: J24.5 R304.2
CAM_RESET: J24.22 R67.2 U4.55(GPIO26)
CNN_GPIO6: J22.9 U4.6(GPIO6)
CNN_GPIO7: J22.8 U4.7(GPIO7)
CNN_GPIO8: J22.7 U4.8(GPIO8)
CNN_GPIO10: J22.5 U4.11(GPIO10)
CNN_GPIO34: J22.6 U4.65(GPIO34)
CNN_GPIO37: J22.20 R259.2
CNN_GPIO38: J22.19 R118.2
CNN_GPIO50: J22.18 U4.93(GPIO50)
CNN_GPIO51: J22.17 U4.94(GPIO51)
CNN_GPIO52: J22.16 U4.95(GPIO52)
CNN_GPIO53: J22.15 U4.97(GPIO53)
CNN_GPIO54: J22.13 U4.98(GPIO54)
CSI_CLKN: R25.2 R283.2
CSI_CLKN_A: R283.1 U4.45(CSI_CLKN)
CSI_CLKP: R24.2 R284.2
CSI_CLKP_A: R284.1 U4.44(CSI_CLKP)
CSI_DATA0N: R27.2 R286.2
CSI_DATA0N_A: R286.1 U4.42(CSI_DATAN0)
CSI_DATA0P: R26.2 R285.2
CSI_DATA0P_A: R285.1 U4.43(CSI_DATAP0)
CSI_REXT: R203.1 U4.48(CSI_REXT)
DSI_REXT: R202.1 U4.34(DSI_REXT)
EN_DCDC: U1.1(EN/PG) U4.79(EN_DCDC)
ENCODER_A: R292.1 SW6.1(A) U4.90(GPIO48)
ENCODER_B: R293.1 SW6.4(B) U4.89(GPIO47)
ENCODER_SW: R295.1 SW6.2(S) U4.2(GPIO2)
ESP_3V3: C6.1 C82.1 C83.1 C84.1 C85.1 C87.1 C88.1 C90.1 C95.1 C96.1 C97.1 C98.1 C99.1 C100.1 C103.1 C109.1 C110.1 C121.1 C122.1 C174.1 C178.1 L5.2 Q2.2(S) Q8.2(S) Q10.2(S) R2.2 R3.1 R4.2 R128.1 R129.1 R130.1 R131.1 R132.1 R133.1 R134.2 R135.2 R146.1 R230.2 R262.2 R263.2 R264.2 R295.2 R306.1 R309.2 TP49.1 TP53.1 U1.4(VIN) U4.9(VDDPST_1) U4.21(VDDPST_2) U4.51(VCCA) U4.62(VDDPST_4) U4.75(VDDPST_LDO) U4.77(VDDPST_DCDC) U4.96(VDDPST_6) U4.101(VDDA) U4.102(VBAT) U11.3(3V3)
ESP_EN: C2.2 R2.1 SW1.3 U4.103(CHIP_PU)
ESP_I2C_SCL: J22.12 R273.1 R303.2 U4.14(GPIO13) U13.12(SCX)
ESP_I2C_SDA: J22.10 R272.1 R302.2 U4.15(GPIO14) U13.2(SDX)
ESP_LDO_VO1: C5.1 C20.1 C25.1 C56.1 R7.2 TP26.1 U2.8(VCC) U4.30(VDDPST_3) U4.71(VFB1/VO1)
ESP_LDO_VO2: C50.1 C104.1 C105.1 TP24.1 U4.59(VDDPST#59) U4.67(VDDPST#67) U4.72(VFB2/VO2)
ESP_LDO_VO3: C55.1 C91.1 C92.1 C93.1 TP27.1 U4.41(VDD_MIPI_DPHY) U4.73(VFB3/VO3)
ESP_LDO_VO4: C51.1 C101.1 C102.1 R17.1 R231.1 R232.1 R233.1 R234.1 R280.1 R292.2 R293.2 TP25.1 U4.74(VFB4/VO4) U4.85(VDDPST_5)
ESP_VDD_HP: C7.1 C8.1 C86.1 C89.1 C94.1 C107.1 C173.1 L1.2 R8.1 U4.26(VDD_HP_0) U4.76(VDD_HP_2) U4.91(VDD_HP_3)
FB_DCDC: C7.2 R8.2 R9.1 U1.5(FB) U4.78(FB_DCDC)
FLASH_CK: U2.6(CLK) U4.32(FLASH_CK)
FLASH_CS: R7.1 U2.1(/CS) U4.27(FLASH_CS)
FLASH_D: U2.5(DI) U4.33(FLASH_D)
FLASH_HD: U2.7(/HOLD) U4.31(FLASH_HOLD)
FLASH_Q: U2.2(DO) U4.28(FLASH_Q)
FLASH_WP: U2.3(/WP) U4.29(FLASH_WP)
GPIO0: R61.1 U4.104(GPIO0)
GPIO1: R59.1 U4.1(GPIO1)
GPIO11: R304.1 U4.12(GPIO11)
GPIO21: R255.1 U4.23(GPIO21)
GPIO22: R23.1 U4.24(GPIO22)
GPIO24: R104.1 U4.52(GPIO24)
GPIO25: R105.1 U4.53(GPIO25)
GPIO27: R278.1 U4.56(GPIO27)
GPIO28: R277.1 U4.57(GPIO28)
GPIO29: R276.1 U4.58(GPIO29)
GPIO30: R275.1 U4.60(GPIO30)
GPIO31: R274.1 U4.61(GPIO31)
GPIO32: R279.1 U4.63(GPIO32)
GPIO35_BOOT: C3.1 R4.1 R300.1 SW2.3 U4.66(GPIO35)
GPIO36: R3.2 R250.1 U4.68(GPIO36)
GPIO37: R259.1 U4.69(GPIO37)
GPIO38: R118.1 U4.70(GPIO38)
GPIO39: R122.1 U4.80(GPIO39)
GPIO40: R110.1 U4.81(GPIO40)
GPIO41: R108.1 U4.82(GPIO41)
GPIO42: R107.1 U4.83(GPIO42)
GPIO43: R103.1 U4.84(GPIO43)
GPIO44: R102.1 U4.86(GPIO44)
LCD_BL: Q2.1(G) R79.1 R306.2 U4.22(GPIO20)
LCD_CS: J5.8(CS) R241.1 U4.19(GPIO18)
LCD_DC: J5.7(RS) U4.20(GPIO19)
LCD_RST: J5.11(RESET) R238.1 U4.16(GPIO15)
LCD_SCLK: J5.9(SCK) U4.18(GPIO17)
LCD_SDA: J5.10(SDA) U4.17(GPIO16)
LED_A: J5.3(LED_A) Q2.3(D)
LED_CTRL: Q4.1(G) R73.1 U4.25(GPIO23)
LED_K: J5.2(LED_K) R243.1
LPI2S_CLK: R23.2 U9.3(CLK)
LPI2S_DAT: R255.2 U9.4(DATA)
PWR_CTRL: Q1.1(G) R310.2 U4.13(GPIO12) U16.3(EN)
SD1_CLK: D6.2 J21.5(CLK) R103.2
SD1_CMD: D4.2 J21.3(CMD) R17.2 R102.2
SD1_D0: D11.2 J21.7(DATA0) R122.2 R232.2
SD1_D1: D10.2 J21.8(DATA1) R110.2 R233.2
SD1_D2: D8.2 J21.1(DATA2) R108.2 R234.2
SD1_D3: D7.2 J21.2(CD/DATA3) R107.2 R231.2
SD1_VDD: C148.1 C149.1 D3.2 J21.4(VDD) Q8.3(D)
SD2_CLK: R132.2 R277.2 U11.25(IO19)
SD2_CMD: R133.2 R278.2 U11.24(IO18)
SD2_D0: R131.2 R276.2 U11.26(IO20)
SD2_D1: R130.2 R275.2 U11.27(IO21)
SD2_D2: R129.2 R274.2 U11.28(IO22)
SD2_D3: R128.2 R279.2 U11.29(IO23)
SD_DET: D22.2 J21.9(CD) R280.2 U4.87(GPIO45)
SD_PWRN: Q8.1(G) R308.2 R309.1 U4.88(GPIO46)
USB_DM: D20.2 J6.7(B7_DN2) J6.9(A7_DN1) U4.49(DM)
USB_DP: D21.2 J6.8(A6_DP1) J6.10(B6_DP2) U4.50(DP)
USB_SJ_DN: D16.2 J23.7(B7_DN2) J23.9(A7_DN1) R104.2
USB_SJ_DP: D17.2 J23.8(A6_DP1) J23.10(B6_DP2) R105.2
VUSB: C118.1 C119.1 C169.2 D12.2(K) D18.2(K) Q6.2(S) Q9.2(S) R290.2 R291.2 R311.2 SW7.3 U20.4(VCC) U20.8(CE)
VUSB1_IN: D18.1(A) D19.2 D23.1 J23.3(A4_VBUS) J23.4(B9_VBUS) J23.13(B4_VBUS) J23.14(A9_VBUS)
VUSB2_IN: D12.1(A) D15.2 D23.2 J6.3(A4_VBUS) J6.4(B9_VBUS) J6.13(B4_VBUS) J6.14(A9_VBUS)
XTAL_N: R5.1 U4.99(XTAL_N)
XTAL_P: R1.1 U4.100(XTAL_P)
N16934509: C1.1 R1.2 Y1.1(XIN)
N16934523: C4.1 R5.2 Y1.3(XOUT)
N18193822: L1.1 U1.3(SW)
N18255493: J6.6(A5_CC1) R142.2
N18255499: J6.12(B5_CC2) R143.2
N18262730: C121.2 R146.2 R148.1 U12.5(FB)
N18262777: R145.2 U12.1(EN/PG)
N18262785: L5.1 U12.3(SW)
N18700058: D1.2(CATHODE) R72.1
N18700064: Q4.3(D) R72.2
N18877972: R246.2 U9.2(L/R)
N18902905: J23.6(A5_CC1) R268.2
N18902911: J23.12(B5_CC2) R269.2
N19010219: D23.3 R288.1 R289.1
N19010303: Q6.1(G) R289.2
N19013156: R10.1 U20.2(PROG)
N19013226: D25.1(ANODE) R290.1
N19013232: D5.1(ANODE) R291.1
N19026853: C19.1 R58.1 R61.2 Y3.2
N19026868: C18.1 R58.2 R59.2 Y3.1
N19027177: C170.1 R297.1 R298.2 Y4.2
N19027184: C171.1 R297.2 R299.2 Y4.1
N19080261: Q9.1(G) R307.1
N19080264: R307.2 SW7.2
N19083043: Q1.3(D) Q10.1(G) R230.1

Pads without a net: J6 5 11; J22 3; J23 5 11; J24 4 10 11 16 17; SW1 2 4; SW2 2 4; SW3 2 4; SW4 2 4; SW5 2 4; U4 35 36 37 38 39 40 46 47 54; U11 4 5 6 7 9 10 15 16 17 18 19 20 21 32 33 34 35; U13 5 6 7 11; U16 4

## Via types
v1: diameter 0.406, hole 0.254, TOP to BOTTOM, 1095 vias

## Routing (per net, layer and track width the routed paths; a pad name or vN(x,y) marks a point on that pad's centre or on a via; arc(x,y) is an arc through that point)
3V3_PERI: length 98.9
  TOP w0.2: R67.1 39.53,35.16 v1(39.52,35.17)
  TOP w0.254: U9.1 49.2,41.23 49.7,41.72 C152.1 51.65,41.45 v1(51.4,41.21)
  TOP w0.3: J24.13 44.25,33.69 43.99,33.95 43.75,33.71 J24.14
  TOP w0.381: v1(43.99,34.68) C48.1 43.99,33.95 ; v1(38.72,40.23) C52.1 38.72,40.8 D1.1
  L3_SIGNAL w0.2: v1(54.44,31.21) 54.44,29.22 v1(54.88,28.79)
  L3_SIGNAL w0.4: v1(58.52,32.37) 58.52,24.88 56.87,23.23 v1(56.69,23.23)
  L5_POWER w0.381: v1(38.72,40.23) 40.42,41.94 50.67,41.94 v1(51.4,41.21) 51.4,36.99 52.97,35.42 55.99,35.42 v1(58.52,32.89)
  BOTTOM w0.2: R272.2 54.88,29.34 v1(54.88,28.79) ; v1(39.52,35.17) 43.51,35.17 v1(43.99,34.68) ; U13.3 56.89,18.75 56.59,18.45 56.12,18.45 55.91,18.67 55.91,21.54 56.25,21.88 56.44,21.88 56.72,22.16 57.11,22.16 57.39,22.44 C53.1 57.56,22.39 57.56,22.01 57.89,21.68 U13.10 ; v1(54.44,31.21) R273.2 55.09,33.15 55.08,33.16
  BOTTOM w0.254: C53.1 C176.1 57.51,23.09 C177.1 57.01,23.87 56.69,23.55 v1(56.69,23.23)
  BOTTOM w0.3: 45.75,21.63 J5.4
  BOTTOM w0.381: v1(56.69,23.23) 55.09,23.23 54.14,22.28 51.79,22.28 51.12,21.61 C150.1 C151.1 49.94,21.61 49.57,21.23 46.14,21.23 45.75,21.63 ; C175.1 TP52.1 56.5,33.16 45.51,33.16 v1(43.99,34.68)
  BOTTOM w0.762: v1(58.52,32.37) v1(58.52,32.89) C175.1 59.85,33.62 Q10.3
GND: length 26.8
  TOP w0.508: J25.1 v1(1.48,20) 1.44,20 ; J25.1 2.5,19.11 ; J25.1 2.5,20.96
  TOP w0.635: SW2.1 3.2,34.25
  TOP w0.762: SW6.10 14.43,34.16 ; SW6.9 8.77,34.17
  L2_GND1 w0.508: J25.1 2.5,19.06 ; J25.1 v1(1.48,20) 1.39,20 ; J25.1 2.5,21.02
  L3_SIGNAL w0.508: J25.1 v1(1.48,20) ; J25.1 2.5,21.01 ; J25.1 2.5,19.12
  L4_GND2 w0.508: 1.36,20 v1(1.48,20) J25.1 ; J25.1 2.5,19.06 ; J25.1 2.5,21.11
  L5_POWER w0.508: 1.42,20 v1(1.48,20) J25.1 ; J25.1 2.5,21.04 ; J25.1 2.5,19.15
  BOTTOM w0.127: 41.68,23.7 41.83,23.85 44.65,23.85 44.77,23.74
  BOTTOM w0.3: U13.4 v1(56.39,18.9)
  BOTTOM w0.508: J25.1 v1(1.48,20) 1.45,20 ; J25.1 2.5,19.1 ; J25.1 2.5,20.93
  vias: v1(0.51,34.06) v1(0.51,32.79) v1(0.52,28.03) v1(0.52,25.77) v1(0.51,23.9) v1(0.52,22.45) v1(0.51,20.83) v1(0.5,18.53) v1(0.51,16.24) v1(0.55,14.07) v1(0.55,10.73) v1(0.51,7.57) v1(0.51,5.52) v1(0.51,3.16) v1(0.53,0.52) v1(1.49,19.39) v1(1.71,34.07) v1(1.78,31.67) v1(1.83,23.09) v1(1.91,29.6) v1(1.91,26.86) v1(1.88,24.33) v1(2.18,19.08) v1(2.3,21.83) v1(2.34,15.29) v1(2.44,33.55) v1(2.36,12.83) v1(2.39,9.14) v1(2.37,6.95) v1(2.48,32.59) v1(2.51,21.04) v1(2.54,17.68) v1(2.57,16.5) v1(2.6,4.13) v1(2.79,34.26) v1(2.92,19.06) v1(3.15,27.85) v1(3.14,22.9) v1(3.19,30.86) v1(3.19,29.84) v1(3.31,5.6) v1(3.38,34.25) v1(3.4,25.83) v1(3.37,11.2) v1(3.51,1.93) v1(3.61,21.03) v1(3.85,0.53) v1(3.92,28.44) v1(3.86,23.98) v1(3.94,21.96) v1(3.92,15.71) v1(3.99,31.84) v1(4.17,33.55) v1(4.32,19.11) v1(4.31,14.59) v1(4.36,29.62) v1(4.45,25.11) v1(4.42,22.4) v1(4.39,7.4) v1(4.78,34.24) v1(4.89,27.97) v1(4.89,27.41) v1(4.86,23.93) v1(4.91,12.28) v1(4.9,9.63) v1(4.98,16.54) v1(5.18,1.93) v1(5.27,31.53) v1(5.52,18.31) v1(5.98,5.64) v1(5.99,4.43) v1(6.17,32.58) v1(6.43,22.19) v1(6.49,34.24) v1(6.48,14.78) v1(6.55,21.31) v1(6.74,30.1) v1(6.74,29.57) v1(6.69,7.34) v1(6.69,6.77) v1(7.01,21.87) v1(7.05,14.77) v1(7.02,3.29) v1(7.14,33.57) v1(7.07,12.19) v1(7.16,31.52) v1(7.33,28.37) v1(7.26,0.52) v1(7.52,17.45) v1(7.63,27.39) v1(7.7,19.11) v1(7.73,8.84) v1(7.76,23.79) v1(7.79,9.82) v1(7.89,29.72) v1(7.89,7.66) v1(7.99,21.34) v1(7.96,11.65) v1(8.01,10.35) v1(8.14,34.21) v1(8.24,15.14) v1(8.15,12.81) v1(8.24,9.37) v1(8.28,5.64) v1(8.26,4.45) v1(8.33,3.09) v1(8.55,26.76) v1(8.6,24.6) v1(8.65,12.1) v1(8.7,34.21) v1(8.83,19.19) v1(8.84,1.88) v1(8.85,21.96) v1(8.89,15.14) v1(8.99,17.58) v1(9.02,9.99) v1(9.08,25.03) v1(9.21,9.04) v1(9.27,31.42) v1(9.33,26.57) v1(9.49,11.81) v1(9.56,33.58) v1(9.68,10.33) v1(9.78,0.51) v1(9.87,13.06) v1(9.98,14.41) v1(10.12,4.43) v1(10.2,32.63) v1(10.16,22.75) v1(10.21,3.26) v1(10.3,29.74) v1(10.34,7.58) v1(10.29,5.69) v1(10.35,17.23) v1(10.44,1.88) v1(10.54,34.24) v1(10.45,19.98) v1(10.49,17.86) v1(10.6,27.99) v1(10.97,19.35) v1(11.02,17.35) v1(11.04,13.36) v1(11.2,26.62) v1(11.18,24.24) v1(11.35,22.73) v1(11.51,9.21) v1(11.63,33.58) v1(11.57,18.8) v1(11.61,17.35) v1(11.93,31.43) v1(12,5.77) v1(12.01,4.43) v1(12.05,25.2) v1(12.19,0.51) v1(12.34,29.57) v1(12.37,3.25) v1(12.46,26.64) v1(12.61,34.23) v1(12.59,8.72) v1(12.97,7.43) v1(13.14,32.6) v1(13.13,28.52) v1(13.35,18.46) v1(13.36,20.25) v1(13.51,15.58) v1(13.83,8.88) v1(13.93,19.35) v1(14.01,6.16) v1(14.11,2.03) v1(14.11,0.51) v1(14.19,31.51) v1(14.54,14.39) v1(14.63,34.23) v1(14.63,26.63) v1(14.59,11.49) v1(14.73,20.25) v1(14.73,18.49) v1(14.67,5.12) v1(14.81,23.25) v1(14.76,15.54) v1(14.88,12.73) v1(14.87,8.65) v1(14.86,7.01) v1(15.1,32.5) v1(15.21,34.23) v1(15.15,30.58) v1(15.24,24.04) v1(15.34,3.45) v1(15.4,19.35) v1(15.68,9.39) v1(15.91,0.52) v1(15.96,31.33) v1(16.03,18.5) v1(16.07,27.43) v1(16.1,20.26) v1(16.05,15.81) v1(16.12,12.94) v1(16.1,11.87) v1(16.19,14.11) v1(16.54,8.69) v1(16.56,7.1) v1(16.65,2.37) v1(16.66,4.58) v1(17.01,30.52) v1(16.98,28.51) v1(16.98,26.4) v1(16.97,24.87) v1(17.25,32.6) v1(17.27,14.71) v1(17.27,13.2) v1(17.27,11.87) v1(17.49,34.33) v1(17.46,22.15) v1(17.58,0.53) v1(18,31.48) v1(17.97,27.39) v1(18.24,35.28) v1(18.39,25.95) v1(18.4,24.78) v1(18.41,23.41) v1(18.35,15.86) v1(18.4,5.87) v1(18.47,21.41) v1(18.45,11.87) v1(18.49,6.91) v1(18.58,18.41) v1(18.71,32.93) v1(18.77,34.3) v1(18.82,30.25) v1(18.83,28.37) v1(18.83,12.41) v1(18.77,4.19) v1(18.9,10.25) v1(18.94,8.37) v1(18.96,5.85) v1(19.14,0.52) v1(19.24,33.11) v1(19.3,23.65) v1(19.3,9.84) v1(19.39,14.78) v1(19.38,13.09) v1(19.48,20.37) v1(19.48,18.82) v1(19.46,11.35) v1(19.56,22.45) v1(19.68,4.01) v1(19.79,3.21) v1(20.12,6.64) v1(20.17,35.27) v1(20.19,34.34) v1(20.45,30.07) v1(20.43,28.49) v1(20.52,31.65) v1(20.5,4.04) v1(20.5,3.12) v1(20.94,10.76) v1(20.98,34.44) v1(21.07,27.04) v1(21.08,24.17) v1(21.23,22.72) v1(21.23,20.5) v1(21.54,24.88) v1(21.5,16.71) v1(21.48,14.9) v1(21.46,12.78) v1(21.62,31.79) v1(21.64,29.17) v1(21.63,27.67) v1(21.74,35.15) v1(21.73,34.48) v1(21.67,33.13) v1(21.72,26.29) v1(21.74,9.94) v1(21.81,25.68) v1(21.93,5.63) v1(21.93,3.92) v1(22.14,8.69) v1(22.3,12.23) v1(22.31,6.82) v1(22.39,0.53) v1(22.62,22.82) v1(22.62,16.89) v1(22.64,15.68) v1(22.66,24.43) v1(22.72,18.69) v1(23.1,35.14) v1(23.18,23.94) v1(23.34,33.1) v1(23.34,27.04) v1(23.27,23.04) v1(23.37,30.21) v1(23.51,17.27) v1(23.53,14.33) v1(23.46,11.94) v1(23.51,1.66) v1(23.6,34.32) v1(23.83,28.24) v1(23.76,20.28) v1(23.98,26) v1(24.03,18.71) v1(24.13,15.38) v1(24.1,0.5) v1(24.31,31.74) v1(24.33,29.22) v1(24.41,34.32) v1(24.37,20.28) v1(24.38,12.2) v1(24.71,16.66) v1(24.66,5.91) v1(24.71,4.14) v1(24.71,3.28) v1(24.73,2.41) v1(24.71,1.57) v1(24.75,26.29) v1(24.8,7) v1(24.92,24.4) v1(25.08,22.75) v1(25.2,34.32) v1(25.27,30.19) v1(25.29,27.6) v1(25.34,26.29) v1(25.34,18.72) v1(25.35,15.53) v1(25.32,14.19) v1(25.46,33.07) v1(25.49,24.4) v1(25.48,12.2) v1(25.78,20.49) v1(25.76,4.45) v1(25.86,5.91) v1(26.02,34.33) v1(25.96,31.09) v1(25.96,29.14) v1(26.01,23.81) v1(26.01,23.14) v1(25.97,10.21) v1(26.15,22.3) v1(26.14,21.02) v1(26.16,21.67) v1(26.44,15.24) v1(26.7,31.09) v1(26.67,29.12) v1(26.66,10.27) v1(26.8,34.32) v1(27.04,23.53) v1(26.99,21.77) v1(27.1,7) v1(27.18,0.46) v1(27.3,26.21) v1(27.42,31.08) v1(27.42,30.43) v1(27.43,29.79) v1(27.42,29.12) v1(27.42,28.27) v1(27.42,27.69) v1(27.36,10.27) v1(27.37,2.86) v1(27.55,18.83) v1(27.52,5.91) v1(27.52,4.1) v1(27.61,34.32) v1(27.67,17.42) v1(27.67,6.99) v1(27.79,3.38) v1(27.89,10.27) v1(28.02,22.8) v1(28.07,31.09) v1(28.11,29.12) v1(28.27,33.07) v1(28.32,24.37) v1(28.41,34.32) v1(28.74,31.09) v1(28.78,29.12) v1(28.8,3.37) v1(28.85,20.12) v1(29.01,6.91) v1(28.97,4.42) v1(29.1,15.57) v1(29.2,34.33) v1(29.21,9.26) v1(29.16,3.85) v1(29.38,31.09) v1(29.38,30.44) v1(29.38,29.77) v1(29.39,29.12) v1(29.4,28.26) v1(29.39,27.61) v1(29.62,17.58) v1(29.73,33.06) v1(29.72,11.37) v1(29.67,7.48) v1(29.84,1.56) v1(29.95,26.42) v1(30,34.32) v1(30.04,31.08) v1(30.01,18.83) v1(30.06,0.46) v1(30.28,20.19) v1(30.52,29.11) v1(30.52,2.95) v1(30.8,34.33) v1(30.84,22.03) v1(30.89,31.08) v1(30.96,23.03) v1(31.09,29.12) v1(31.13,1.56) v1(31.19,16.98) v1(31.18,16.26) v1(31.29,21.02) v1(31.42,33.06) v1(31.38,27.8) v1(31.36,12.53) v1(31.53,31.06) v1(31.48,20.09) v1(31.6,34.33) v1(31.75,29.84) v1(32.07,22.01) v1(32.3,20.12) v1(32.31,12.04) v1(32.26,0.47) v1(32.4,34.33) v1(32.37,32.64) v1(32.41,17.6) v1(32.36,14.78) v1(32.55,21.09) v1(32.87,31.04) v1(32.93,24.09) v1(32.93,14.78) v1(32.89,12.04) v1(32.96,17.6) v1(33.1,29.57) v1(33.1,9.13) v1(33.17,34.33) v1(33.22,4.44) v1(33.29,23.22) v1(33.32,21.87) v1(33.34,6.38) v1(33.3,5.42) v1(33.36,33.1) v1(33.43,17.32) v1(33.69,35.17) v1(33.95,16.59) v1(33.93,15.27) v1(33.93,14.72) v1(34.02,19.88) v1(33.96,17.32) v1(33.96,13.84) v1(33.97,13.13) v1(33.99,11.65) v1(33.99,10.73) v1(34.01,9.14) v1(34.07,20.65) v1(34.21,21.86) v1(34.26,22.83) v1(34.54,24.51) v1(34.47,4.52) v1(34.61,11.99) v1(35.04,35.15) v1(35.13,29.13) v1(35.2,34.37) v1(35.15,33.11) v1(35.17,31.03) v1(35.19,27.7) v1(35.17,14.68) v1(35.26,36.11) v1(35.33,17.61) v1(35.26,11.99) v1(35.55,37.11) v1(35.57,19.05) v1(35.74,26.06) v1(35.74,24.78) v1(35.7,22.61) v1(35.75,30.07) v1(35.75,23.81) v1(35.81,20.41) v1(35.75,14.67) v1(35.78,9.08) v1(35.93,11.98) v1(35.98,39.9) v1(35.95,17.35) v1(36.32,19.46) v1(36.32,9.08) v1(36.33,5.18) v1(36.35,4.14) v1(36.53,33.07) v1(36.47,31.18) v1(36.54,27.13) v1(36.51,6.17) v1(36.63,16.8) v1(36.61,15.43) v1(36.6,14.01) v1(36.6,13.42) v1(36.68,42.46) v1(36.73,37.88) v1(36.74,17.48) v1(36.69,10.93) v1(36.93,34.32) v1(36.93,22.77) v1(36.97,24.75) v1(37.02,6.49) v1(37.01,4.28) v1(36.96,3.52) v1(37.08,36.2) v1(37.13,4.98) v1(37.25,20.82) v1(37.33,21.96) v1(37.33,17.48) v1(37.34,7) v1(37.48,9.07) v1(37.6,31.22) v1(37.69,39.22) v1(37.69,14.67) v1(37.74,3.31) v1(37.82,11.98) v1(38.14,41.62) v1(38.18,35.29) v1(38.15,33.1) v1(38.18,27.06) v1(38.42,23.09) v1(38.38,14.68) v1(38.53,29.13) v1(38.49,11.98) v1(38.53,3.31) v1(38.58,32.12) v1(38.65,24.54) v1(38.63,19.44) v1(38.68,42.24) v1(38.7,35.84) v1(38.71,21.53) v1(38.91,37.68) v1(38.91,31.11) v1(39.03,29.65) v1(38.96,19.85) v1(39,14.68) v1(39.08,39.67) v1(39.09,6.67) v1(39.28,22.48) v1(39.31,17.06) v1(39.43,10.85) v1(39.54,15.38) v1(39.54,14.68) v1(39.55,13.83) v1(39.54,13.04) v1(39.64,24.28) v1(39.57,16.59) v1(39.59,12.32) v1(39.71,6.68) v1(39.84,35.62) v1(39.97,30.14) v1(40.13,36.25) v1(40.09,34.71) v1(40.17,33.95) v1(40.21,32.25) v1(40.2,6.22) v1(40.2,5.6) v1(40.2,3.33) v1(40.37,21.6) v1(40.49,22.78) v1(40.47,6.78) v1(40.49,5.02) v1(40.6,42.51) v1(40.84,7.26) v1(40.87,39.12) v1(40.93,3.63) v1(40.98,4.48) v1(41.06,31.33) v1(41.11,29.79) v1(41.22,5.94) v1(41.35,22.92) v1(41.44,8.52) v1(41.53,18.07) v1(41.53,6.86) v1(41.61,37.45) v1(41.58,24.75) v1(41.58,12.97) v1(41.64,3.35) v1(41.74,16.43) v1(41.83,36.23) v1(41.82,33.97) v1(41.87,35.6) v1(41.87,34.71) v1(41.95,26.61) v1(41.9,21.6) v1(41.87,19.44) v1(42,32.16) v1(42.02,30.43) v1(41.99,28.52) v1(42.09,24.75) v1(42.11,8.99) v1(42.09,5.36) v1(42.21,29.74) v1(42.19,13.98) v1(42.23,12.33) v1(42.42,26.59) v1(42.43,19.7) v1(42.39,6.92) v1(42.48,28.52) v1(42.46,4.38) v1(42.56,31.48) v1(42.58,24.75) v1(42.56,10.15) v1(42.56,8.48) v1(42.82,36.96) v1(42.81,17.21) v1(42.8,9.19) v1(42.77,6.22) v1(42.94,32.17) v1(42.89,3.39) v1(42.98,39.24) v1(43.13,34.02) v1(43.19,42.51) v1(43.33,5.54) v1(43.41,34.65) v1(43.37,9.8) v1(43.74,28.97) v1(43.7,26.47) v1(43.69,13.2) v1(43.84,36.03) v1(43.85,41.38) v1(43.85,31.41) v1(43.92,4.45) v1(44.21,9.8) v1(44.4,38.53) v1(44.37,5.56) v1(44.53,30.24) v1(44.73,37.25) v1(44.77,34.68) v1(44.75,32.26) v1(44.81,25.78) v1(44.82,18.77) v1(44.83,17.93) v1(44.83,17.03) v1(44.84,16.1) v1(44.95,22.21) v1(44.88,10.15) v1(44.98,40.94) v1(45.01,26.35) v1(45.05,5.94) v1(45.15,20.78) v1(45.06,9.45) v1(45.16,7.95) v1(45.16,7.39) v1(45.31,13.17) v1(45.5,42.51) v1(45.59,31.39) v1(45.61,18.76) v1(45.59,17.93) v1(45.59,17.03) v1(45.61,16.12) v1(45.68,8.39) v1(45.67,7) v1(45.78,9.18) v1(45.77,6.22) v1(46.04,38.53) v1(46.09,41.34) v1(46.09,40.49) v1(46.1,34.79) v1(46.08,28.74) v1(46.23,36.41) v1(46.2,33.95) v1(46.19,24.75) v1(46.33,32.12) v1(46.3,13.82) v1(46.42,18.75) v1(46.42,17.93) v1(46.41,17.02) v1(46.41,16.12) v1(46.46,39.83) v1(46.49,37.22) v1(46.72,24.75) v1(46.75,10.12) v1(46.98,7.47) v1(47.07,42.47) v1(47.1,9.09) v1(47.31,38.27) v1(47.31,31.42) v1(47.29,30.25) v1(47.31,18.75) v1(47.31,17.93) v1(47.31,17.01) v1(47.29,16.1) v1(47.47,13.2) v1(47.57,39.09) v1(47.61,23.43) v1(47.62,22.75) v1(47.8,33.96) v1(47.79,32.21) v1(47.92,35.83) v1(47.88,34.76) v1(48.13,24.75) v1(48.15,18.62) v1(48.13,17.91) v1(48.15,16.09) v1(48.16,16.98) v1(48.23,1.35) v1(48.33,42.49) v1(48.31,15.47) v1(48.27,13.89) v1(48.31,10.27) v1(48.26,8.79) v1(48.37,39.09) v1(48.62,35.1) v1(48.6,28.96) v1(48.56,27.15) v1(48.84,34.05) v1(48.83,32.14) v1(48.83,30.38) v1(49.12,39.09) v1(49.14,0.48) v1(49.17,21.81) v1(49.5,42.46) v1(49.68,36.64) v1(49.75,24.26) v1(49.78,2.9) v1(49.91,24.75) v1(49.91,22.94) v1(50.13,39.8) v1(50.05,27.53) v1(50.09,20.89) v1(50.16,34.04) v1(50.2,32.27) v1(50.44,37.83) v1(50.36,35) v1(50.51,41.21) v1(50.51,40.45) v1(50.71,34.02) v1(50.94,31.19) v1(51.04,31.97) v1(51,26.59) v1(50.99,23.08) v1(51.07,42.49) v1(51.1,1.44) v1(51.41,36.12) v1(51.41,24.79) v1(51.6,33.72) v1(51.7,32.56) v1(51.65,4.78) v1(51.85,31.22) v1(51.88,3.02) v1(51.99,40.51) v1(52.02,39) v1(52.13,37.43) v1(52.11,19.81) v1(52.16,42.23) v1(52.24,23.15) v1(52.35,25.72) v1(52.46,24.57) v1(52.74,31.22) v1(52.69,18.87) v1(52.7,16.28) v1(52.74,12.37) v1(52.77,40.94) v1(52.77,32.58) v1(52.78,14) v1(52.81,11.29) v1(52.88,36.31) v1(53.09,0.52) v1(53.17,39.22) v1(53.4,34.8) v1(53.37,24.3) v1(53.4,14.72) v1(53.44,6.55) v1(53.64,25.73) v1(53.71,31.94) v1(53.72,31.29) v1(53.66,29.02) v1(53.66,28.3) v1(54.06,36.49) v1(54.08,13.8) v1(54.05,8.76) v1(54.2,23.24) v1(54.24,18.9) v1(54.17,18.06) v1(54.2,5.5) v1(54.27,15.62) v1(54.31,10.5) v1(54.53,32.54) v1(54.58,7.94) v1(54.71,34.61) v1(54.95,25.72) v1(55.12,16.36) v1(55.21,13.22) v1(55.38,28.42) v1(55.37,18.08) v1(55.52,4.15) v1(55.47,1.97) v1(56.1,36.5) v1(56.24,31.6) v1(56.3,34.26) v1(56.53,16.26) v1(56.83,32.66) v1(56.83,32.11) v1(57.02,3.26) v1(57.11,25.7) v1(57.15,21.72) v1(57.09,0.52) v1(57.18,29.91) v1(57.24,11.42) v1(57.34,27.94) v1(57.32,17.27) v1(57.53,9.68) v1(57.65,35.52) v1(57.62,34.67) v1(57.75,32.63) v1(57.7,6.18) v1(57.78,25.31) v1(57.85,14.99) v1(57.85,14.35) v1(57.89,30.81) v1(57.92,29.01) v1(57.87,18.92) v1(58.19,23.71) v1(58.18,8.17) v1(58.34,36.47) v1(58.45,18.21) v1(58.42,13.31) v1(58.47,23.16) v1(58.53,15.9) v1(59.11,29.07) v1(59.11,28.27) v1(59.08,23.91) v1(59.09,11.16) v1(59.3,35.26) v1(59.36,32.8) v1(59.45,31.05) v1(59.7,23.93) v1(59.75,28.28) v1(59.91,6.16) v1(60.05,25.77) v1(60.02,18.22) v1(60.29,31.7) v1(60.55,13.3) v1(60.85,36.49) v1(60.83,33.24) v1(61.3,34.72) v1(61.35,10.68) v1(61.61,30.25) v1(61.57,27.9) v1(61.57,23.19) v1(61.67,29.08) v1(61.72,26.66) v1(61.66,25.18) v1(61.71,19.76) v1(61.66,14.99) v1(61.66,14.35) v1(61.79,17.27) v1(62.05,32.3) v1(62.05,21.77) v1(62.1,8.05) v1(62.28,13.63) v1(62.37,24.27) v1(63,27.89) v1(63,25.74) v1(63,25.18) v1(63.2,6.16) v1(63.33,15.86) v1(63.41,36.46) v1(63.45,34.53) v1(63.4,19.84) v1(63.55,30.95) v1(63.59,23.79) v1(63.69,22.53) v1(64.15,28.82) v1(64.38,31.71) v1(64.41,30.19) v1(64.57,34.77) v1(64.57,24.88) v1(64.66,25.46) v1(64.69,21.32) v1(64.66,17.78) v1(65.11,23.99) v1(65.18,30.94) v1(65.16,27.9) v1(66.03,36.46) v1(66.01,15.86) v1(66.04,6.15) v1(66.07,19.86) v1(66.15,22.73) v1(66.31,30.1) v1(66.29,27.27) v1(66.31,25.43) v1(66.87,8.19) v1(67.25,13.72) v1(67.3,21.37) v1(67.46,17.74) v1(67.63,33.87) v1(67.65,36.44) v1(68.22,31.55) v1(68.31,26.2) v1(68.35,30.04) v1(68.43,15.99) v1(68.43,12.85) v1(68.44,9.18) v1(68.48,28.14) v1(68.47,23.95) v1(68.45,19.94) v1(68.5,6.13)
VBAT: length 9.1
  BOTTOM w0.254: 9.23,20.81 9.23,20.81 R15.2
  BOTTOM w1: J25.2 7.27,20 Q6.3 8.4,19.98 10.17,21.76 C168.2
VCC_5V: length 106.8
  TOP w0.2: v1(20.21,6.06) 20.05,6.06 18.33,7.79 v1(18.33,8.43)
  TOP w0.508: v1(49.36,35.8) v1(49.91,35.8) 50.71,35.8 51.07,35.45 51.85,35.45 53.81,33.49 C161.1 55.37,33.49 C160.1 55.37,30 J22.1
  L5_POWER w0.381: v1(49.36,35.8) 49.42,35.75 49.42,30.21 52.35,27.28 65.27,27.28 v1(65.28,27.27)
  L5_POWER w0.508: v1(49.91,35.8) v1(49.36,35.8) 48.93,36.23 48.4,36.23 46.71,37.92 43.1,37.92 41.3,39.73 40.04,39.73 37.86,37.54 37.86,36.11 35.47,33.72 17.45,33.72 11.82,28.09 11.82,26.19 9.46,23.83 9.46,18.02 9.65,17.83 9.65,15.6 v1(15.1,10.15) v1(15.67,10.15)
  BOTTOM w0.2: R145.1 20.35,6.06 v1(20.21,6.06)
  BOTTOM w0.381: v1(65.28,27.27) C138.1 65.28,26.4 U16.1
  vias: v1(12.21,10.21) v1(12.53,10.64)
BAT_ADC: length 36
  TOP w0.127: v1(22.39,8.06) 21.67,8.06 11.33,18.4 v1(10.36,18.4) ; U4.92 35.49,7.57 34.44,6.53 v1(34.44,5.91) 34.47,5.88 C172.1
  L3_SIGNAL w0.127: v1(22.39,8.06) 22.86,7.59 22.86,5.84 23.86,4.84 33.38,4.84 v1(34.44,5.91)
  BOTTOM w0.127: v1(10.36,18.4) R16.1 R15.1
BAT_CHRG: length 33.9
  L5_POWER w0.381: v1(4.1,2.02) 5.94,3.86 12.48,3.86 17.81,9.18 17.81,20.75 v1(15.36,23.19)
  BOTTOM w0.381: U20.7 v1(15.36,23.19) ; v1(4.1,2.02) 4.1,2.25 D25.2
BAT_STBY: length 31.8
  L5_POWER w0.381: v1(14.09,23.19) 16.73,20.56 16.73,9.65 12.08,5 v1(3.53,5)
  BOTTOM w0.381: D5.2 v1(3.53,5) ; U20.6 v1(14.09,23.19)
BUTTON_1: length 38
  TOP w0.127: U4.3 40.24,9.66 41.11,9.66 41.38,9.39 v1(41.69,9.39)
  L3_SIGNAL w0.127: v1(19.71,16.08) 22.73,13.06 22.73,11.11 25.91,7.94 31.33,7.94 33.2,9.8 41.01,9.8 41.42,9.39 v1(41.69,9.39)
  BOTTOM w0.127: v1(19.71,16.08) 19.64,16.08 19.05,16.68 19.05,22.6 R262.1 20.92,23.42 SW3.3
BUTTON_2: length 30.6
  TOP w0.127: v1(41.48,9.89) 41.35,10.02 U4.4
  L3_SIGNAL w0.127: v1(41.48,9.89) 41.45,9.92 41.36,9.92 41.22,10.06 33.07,10.06 31.2,8.19 26.06,8.19 23.06,11.19 23.06,13.89 19.96,16.99 v1(19.74,16.99)
  BOTTOM w0.127: SW4.3 20.92,17.43 R263.1 19.74,17.2 v1(19.74,16.99)
BUTTON_3: length 26.7
  TOP w0.127: U4.5 41.65,10.37 42.02,9.99 v1(42.02,9.86)
  L3_SIGNAL w0.127: v1(42.02,9.86) 42.02,9.96 41.66,10.33 32.97,10.33 31.09,8.45 26.21,8.45 23.7,10.96 v1(23.7,11.43)
  BOTTOM w0.127: v1(23.7,11.43) SW5.3 20.92,11.42 R264.1
C6_BOOT: length 25.6
  TOP w0.127: U4.64 29.8,13.87 29.59,14.07 26.43,14.07 25.95,14.55 25.95,18.34 30.12,22.52 31.08,22.52 32.4,23.84 U11.23 32.4,30.78 v1(32.09,31.09)
  BOTTOM w0.127: v1(32.09,31.09) 32.09,31.61 TP45.1
C6_EN: length 68
  TOP w0.127: U4.10 40.56,12.12 40.78,11.9 v1(40.93,11.9) ; C111.1 20.54,27.96 20.54,19.55 v1(25.1,14.99) ; C111.1 R134.1 ; C111.1 22.5,28.5 U11.8 23.24,28.5 v1(23.44,28.7)
  L3_SIGNAL w0.127: v1(40.93,11.9) 40.93,11.62 41.36,11.19 43.92,11.19 45.73,13 45.73,13.8 44.41,15.13 44.41,20.28 42.66,22.03 39.79,22.03 37.63,19.88 34.62,19.88 33.4,18.66 31.41,18.66 30.58,17.83 30.58,16.46 28.71,14.59 27.71,14.59 26.9,13.78 26.3,13.78 v1(25.1,14.99)
  BOTTOM w0.127: TP44.1 30.47,29.63 29.54,28.7 v1(23.44,28.7)
C6_IO0: length 1.2
  TOP w0.127: R298.1 23.6,24.17 U11.12
C6_IO1: length 1.1
  TOP w0.127: U11.13 24.4,24.14 R299.1
C6_IO8: length 1.3
  TOP w0.127: R135.1 31.6,23.94 U11.22
C6_U0RXD: length 34.1
  TOP w0.127: v1(27.5,13.07) 27.53,13.03 28.59,13.03 R300.2 ; v1(33.54,30.18) 33.62,30.1 U11.30
  BOTTOM w0.127: v1(27.5,13.07) 27.37,12.94 24.07,12.94 22.21,14.8 22.21,20.56 21.92,20.85 21.92,22.4 22.21,22.7 22.21,24.85 24.18,26.82 29.77,26.82 33.12,30.18 v1(33.54,30.18) 34.28,30.91 TP46.1
